# Altium PCB PCB1.PcbDoc (part 2 of 3)
Units mil, origin at the board's own origin, x right, y up, seen from the top; angles counter-clockwise.
Board outline 4825 x 2725 mil, 2 copper layers (Top Layer, Bottom Layer); 148 components, 112 nets, 484 pads, 116 vias.
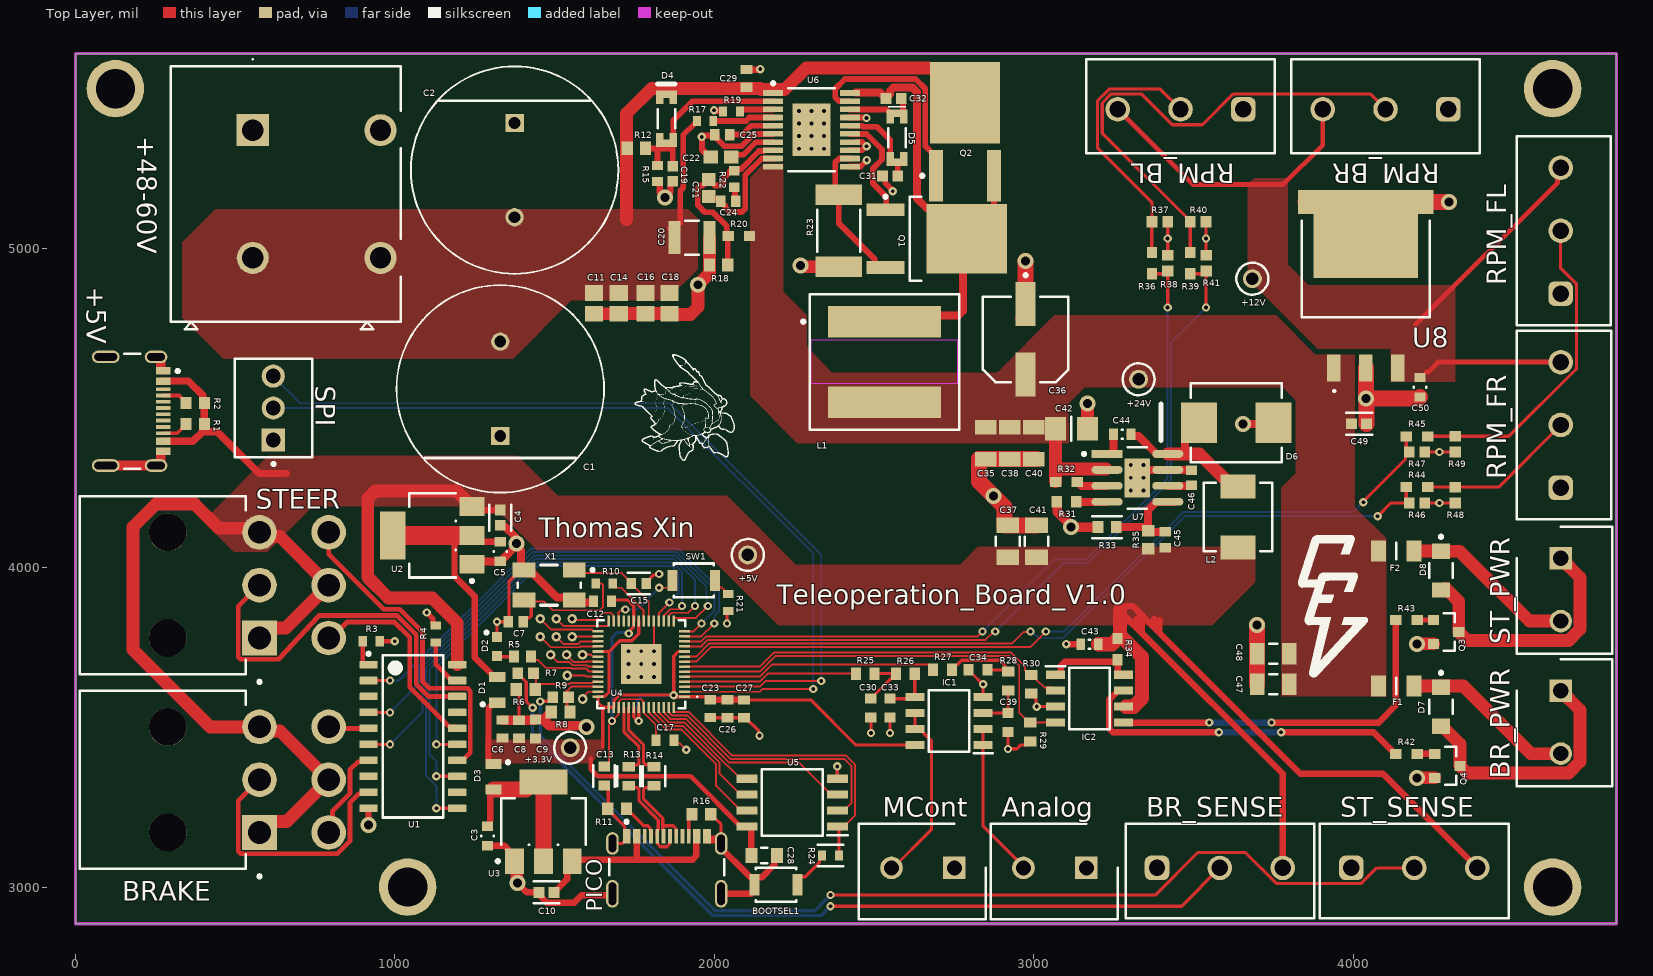
[diagram p0: Top Layer view]

## Part data (continued)
D6: library part CMP-2000-05098-2, "Schottky Barrier Rectifier, 5 A, 60 V, -55 to 125 degC, 2-Pin SMD, RoHS, Tape and Reel", If - Forward Current=5A, Ifsm - Forward Surge Current=100A, Ir - Reverse Current=500uA, Manufacturer="Diodes Incorporated", Manufacturer Part Number=B560C-13-F, Maximum Operating Temperature=+125C, Minimum Operating Temperature=-55C, Operating Temperature Range=-55Cto+125C, Package / Case=SMC, Vf - Forward Voltage=0.7V, Vrrm - Repetitive Reverse Voltage=60V, Brand=DiodesIncorporated, Configuration=Single, Datasheet URL=https://datasheet.ciiva.com/27052/1538961-27052355.pdf, Datasheet Version="Rev. 7-2, 06/2007", Factory Pack Quantity=3000, Height=2.5mm, Length=7.11mm, Manufacturer URL=http://www.diodes.com/, Mounting Style=SMD/SMT, Packaging=Reel, Product=SchottkyDiodes, Product Category=SchottkyDiodes&Rectifiers, RoHS=True, Series=B560, Technology=Si, Termination Style=SMD/SMT, Type=SchottkyBarrierRectifier, Unit Weight=0.007408oz, Width=6.22mm
D7 D8: library part CMP-00278-103808874-1, "NRVBSS34FA Schottky Barrier Rectifier Diode 40V 3A 2-Pin SOD−123FL T/R", Capacitance=152pF, Forward Current=3A, Manufacturer Lifecycle Status=ACTIVE, Max Forward Surge Current (Ifsm)=80A, Max Junction Temperature (Tj)=125°C, Max Repetitive Reverse Voltage (Vrrm)=40V, Min Operating Temperature=-55°C, Peak Reverse Current=500µA, Height=1.43mm, Lifecycle Status=Production, Max Operating Temperature=125°C, NexarPartId=103808874, Reverse Voltage=40V, RoHS=Compliant
F1 F2: "Fuse", Manufacturer_Name=LITTELFUSE, Mouser Part Number=576-046802.5NR, Arrow Part Number=046802.5NR, Arrow Price/Stock=https://www.arrow.com/en/products/046802.5nr/littelfuse?region=nac, Datasheet Link=https://www.littelfuse.com/assetdocs/fuse-468-datasheet?assetguid=6b7857dc-f79c-4aae-8bcc-a9ef11ddef09, Height=0.762mm, Manufacturer_Part_Number=046802.5NR, Mouser Price/Stock=https://www.mouser.co.uk/ProductDetail/Littelfuse/046802.5NR?qs=lHGCbWr7UNKmLbgT05TGjg%3D%3D
IC1: "Integrated Circuit", Manufacturer_Name="Texas Instruments", Mouser Part Number=595-TLV9002IDR, Arrow Part Number=TLV9002IDR, Arrow Price/Stock=https://www.arrow.com/en/products/tlv9002idr/texas-instruments?utm_currency=USD&region=europe, Datasheet Link=http://www.ti.com/lit/gpn/tlv9002, Height=1.75mm, Manufacturer_Part_Number=TLV9002IDR, Mouser Price/Stock=https://www.mouser.co.uk/ProductDetail/Texas-Instruments/TLV9002IDR?qs=xhbEVWpZdWdPu%252BhBN%252BBREg%3D%3D
IC2: "Integrated Circuit", Manufacturer_Name="Texas Instruments", Mouser Part Number=595-UCC27624DR, Arrow Part Number=UCC27624DR, Arrow Price/Stock=https://www.arrow.com/en/products/ucc27624dr/texas-instruments?utm_currency=USD&region=nac, Datasheet Link=https://www.ti.com/lit/ds/symlink/ucc27624.pdf?ts=1654150888910&ref_url=https%253A%252F%252Fwww.ti.com%252Fproduct%252FUCC27624, Height=1.75mm, Manufacturer_Part_Number=UCC27624DR, Mouser Price/Stock=https://www.mouser.co.uk/ProductDetail/Texas-Instruments/UCC27624DR?qs=Rp5uXu7WBW%2FHvRoPIZ55DQ%3D%3D
L1: library part CMP-03913-127637946-2, "Inductor, Aec-Q200, 15Uh, Shielded, 8.3A Rohs Compliant: Yes", Ambient Temperature Range High=85°C, Ambient Temperature Range Low=-40°C, DC Resistance (DCR)=14.8mΩ, Inductance=15µH, Max Operating Temperature=125°C, Saturation Current=7.2A, Height=9.1mm, Length=11.6mm, Min Operating Temperature=-40°C, RoHS=Compliant, Width=10.5mm
L2: library part CMP-02424-000570-1, "Fixed Inductors Commercial Low DCR Series 4.7uH 4.5A 60mΩ 20%", Case/Package=2020, Current Rating=4.5A, DC Resistance (DCR)=60mR, Inductance=4.7uH, Inductance Tolerance=20%, Manufacturer="Vishay Dale", Manufacturer Part Number=IHLP2020CZER4R7M11, Max DC Current=5.2A, Max Operating Temperature=125°C, Min Operating Temperature=-55°C, Package Quantity=2000, Resistance=54mR, RMS Current (Irms)=3.5A, Self Resonant Frequency=27MHz, Test Frequency=100kHz, Core Material=Metal, Depth=5.43mm, Height=3mm, Height - Seated (Max)=0.118inch, Lead Free="Lead Free", Length=5.49mm, Military Standard=Not, Mount="Surface Mount", Number of Pins=2020, Packaging="Tape and Reel", Radiation Hardening=No, Saturation Current=5.2A, Shielding=Shielded, Termination=SMD/SMT, Tolerance=20%, Width=5.18mm
Q1: library part CMP-013-00037-2, "DMT10H009LK3 series N-Channel Mosfet 100V 90A TO252 (DPAK)", Continuous Drain Current (ID)=90A, Drain to Source Resistance=9mΩ, Max Operating Temperature=150°C, Max Power Dissipation=3W, Min Breakdown Voltage=100V, Min Operating Temperature=-55°C, China RoHS=Non-Compliant, Lifecycle Status=Production, Military Standard=MIL-STD-202, Number of Elements=1, Number of Terminals=2, REACH SVHC=No, RoHS=Compliant
Q2: library part CMP-013-00035-2, "Transistor MOSFET N-CH 100V 10A 3-Pin TO-252 Emboss T/R", Continuous Drain Current (ID)=10A, Drain to Source Resistance=147mΩ, Min Breakdown Voltage=100V, Lifecycle Status=Production, Mounting Technology="Surface Mount", Number of Elements=1, Number of Terminals=2, REACH SVHC=No, RoHS=Compliant
Q3 Q4: library part CMP-12801-000047-1, "MOSFET N-CH 60V 1.6A SOT23", Continuous Drain Current=1.6A, Drain To Source Breakdown Voltage=60V, Drain to Source Resistance=92mΩ, Gate To Source Voltage=20V, Input Capacitace At Vds="315pF @ 40V", Manufacturer="Diodes Inc.", Max Forward Diode Voltage=1V, Max Junction Temp=+150°C, Package=SOT23, Power Dissipation=0.7W, Pulse Drain Current=10A, Temperature="-55°C to +150°C", Temperature Range Low=-55°C, Typ Forward Diode Voltage=0.75V, Automotive=No, Category=Trans, ComponentLink2Description=Datasheet, ComponentLink2URL=https://www.diodes.com/assets/Datasheets/DMN6140L.pdf, Depletion Mode=False, Device Class L1="Discrete Semiconductors", Device Class L2=Transistors, Device Class L3=MOSFETs, Digikey Description="MOSFET N-CH 60V 1.6A SOT23", Drain To Source Voltage=60V, Footprint Url=https://www.diodes.com/assets/Package-Files/SOT23.pdf, Gate Charge At Vgs="8.6nC @ 10V", Height=1.1mm, Lead Free=Yes, Manufacturer Part Number=DMN6140L-13, Mouser Description="MOSFET 31V to 99V N-Ch FET 60Vds 20Vgs 2.3A", Number Of Channels=1, Number Of N Channels=1, Octopart=https://octopart.com/dmn6140l-13-diodes+inc.-38898616, Reverse Recovery Charge=9nC, Reverse Recovery Time=16.8ns, RoHS=TRUE, Rthja Max=183°C/W, Standoff Height=0.013mm, Temperature Range High=+150°C, Threshold Vgs Max=3V, Threshold Vgs Min=1V, Turn Off Delay Time=16.3ns, Turn On Delay Time=2.6ns
R1 R2 R33: library part CMP-02407-001424-1, "RES SMD 100 OHM 1% 1/8W 0603", Case Code (Imperial)=0603, Case Code (Metric)=1608, Manufacturer=YAGEO, Manufacturer Part Number=RC0603FR-0710KL, Max Operating Temperature=125°C, Max Power Dissipation=100mW, Min Operating Temperature=-55°C, Resistance=10kR, Temperature Coefficient=25ppm/°C, Tolerance=0.1%, Case/Package=0603, Composition="Thin Film", Features="Automotive AEC-Q200", Number of Terminations=2, Packaging="Tape and Reel"
R3 R4: library part CMP-03412-040480-1, "Anti-Sulfurated Chip Resistors Automotive Grade 0Ω   0603", Case/Package=0603, Manufacturer=YAGEO, Max Operating Temperature=155°C, Max Power Dissipation=100mW, Min Operating Temperature=-55°C, Resistance=0R, Resistor Type="Thick Film", Tolerance=5%, Features="Moisture Resistant", Height=0.022inch, Length=0.063inch, Manufacturer Part Number=AA0603JR-070RL, Number of Terminations=2, Packaging="Tape and Reel", RoHS Compliant=Yes, Series=AF, Width=0.031inch
R5: library part CMP-2000-00205-1, Manufacturer=Panasonic, Part Number=ERJ-3EKF1150V
R6 R8: "Resistor", Manufacturer_Name=Vishay, Arrow Part Number=MCT06030D5001BP500, Arrow Price/Stock=https://www.arrow.com/en/products/mct06030d5001bp500/vishay?utm_currency=USD&region=nac, Datasheet Link=http://www.vishay.com/docs/28705/mcx0x0xpro.pdf, Height=0.55mm, Manufacturer_Part_Number=MCT06030D5001BP500
R7 R9 R38 R41 R46 R47: library part CMP-2000-00945-2, "RES SMD 2K OHM 0.1% 1/10W 0603", Case Code (Imperial)=0603, Case Code (Metric)=1608, Max Operating Temperature=155°C, Max Power Dissipation=100mW, Min Operating Temperature=-55°C, Package Quantity=5000, Resistance=2kR, Resistance Tolerance=0.1%, Resistor Type="Thin Film", Temperature Coefficient=25ppm/°C, Voltage Rating=75V, Case/Package=0603, Construction=Rectangular, Contact Plating=Tin, Depth=0.8mm, Height=0.45mm, Lead Free="Lead Free", Length=1.6mm, Military Standard=Not, Mount="Surface Mount", Number of Pins=2, Number of Terminations=2, Packaging="Tape and Reel", Power Rating=100mW, Radiation Hardening=No, REACH SVHC="No SVHC", RoHS Compliant=Yes, Series=ERA-3A, Technology="THIN FILM", Termination=SMD/SMT, Tolerance=0.1%, Voltage Rating (DC)=75V, Width=0.8mm, Working Voltage=75V
R10 R21 R24: library part CMP-1659-00009-5, "RES 1K OHM 1% 1/10W 0603", Case Code (Imperial)=0603, Case Code (Metric)=1608, Max Operating Temperature=155°C, Max Power Dissipation=100mW, Min Operating Temperature=-55°C, Resistance=1kR, Resistance Tolerance=1%, Resistor Type="Thick Film", Temperature Coefficient=100ppm/°C, Voltage Rating=50V, Case/Package=0603, Construction=Rectangular, Contact Plating=Tin, Depth=0.8mm, Features="Moisture Resistant", Height=0.45mm, Lead Free="Lead Free", Length=1.6mm, Military Standard=Not, Number of Terminations=2, Packaging="Tape and Reel", Power Rating=100mW, Radiation Hardening=No, REACH SVHC="No SVHC", RoHS Compliant=Yes, Series=RC, Size Code=0603, Technology="THICK FILM", Termination=SMD/SMT, Tolerance=1%
R11 R16: library part CMP-009-00178-1, "Fixed Resistor, Metal Glaze/thick Film, 0.1W, 5100ohm, 75V, 1% +/-Tol, 100ppm/Cel, Surface Mount, 0603", Case/Package=0603, Max Operating Temperature=155°C, Min Operating Temperature=-55°C, Power=100mW, Tolerance=1%, Mounting Technology="Surface Mount", Pins=2, RoHS Compliant=Yes
R12: library part CMP-2000-00591-1, Manufacturer=Panasonic, Part Number=ERJ-3EKF6192V
R13 R14: library part CMP-2000-03146-2, "RES Thick Film, 27.4Ω, 1%, 0.1W, 100ppm/°C, 0603", Case Code (Imperial)=0603, Case Code (Metric)=1608, Max Operating Temperature=155°C, Max Power Dissipation=100mW, Min Operating Temperature=-55°C, Package Quantity=10, Resistance=27.4R, Temperature Coefficient=100ppm/°C, Tolerance=1%, Voltage Rating=75V, Case/Package=0603, Composition="Thick Film", Contact Plating=Tin, Depth=0.85mm, Features="Automotive AEC-Q200", Height=0.45mm, Lead Free="Lead Free", Length=1.55mm, Military Standard=Not, Mount="Surface Mount", Number of Pins=2, Number of Terminations=2, Packaging="Tape and Reel", Power Rating=100mW, Radiation Hardening=No, Termination=SMD/SMT, Voltage Rating (DC)=75V, Weight=7.1E-05oz, Width=0.85mm
R15: library part CMP-2000-00479-1, Manufacturer=Panasonic, Part Number=ERJ-3EKF3921V
R17: library part CMP-1659-00056-1, "Chip Resistor, 1 MOhm, +/- 1%, 100 mW, -55 to 155 degC, 0603 (1608 Metric), RoHS, Tape and Reel", Capacitance="1 mF", Case\Package=Radial, Max Operating Temperature="85 degC", Min Operating Temperature="-40 degC", Package Quantity=200, Tolerance=20%, Voltage Rating="25 V", ComponentLink1Description="Manufacturer URL", ComponentLink1URL=http://www.yageo.com/, ComponentLink2Description=Datasheet, ComponentLink2URL=http://www.yageo.com/documents/recent/PYu-RC_Group_51_RoHS_L_04.pdf, DatasheetVersion="Rev. 4, 02/2016", Diameter="10 mm", Height="20 mm", Lead Pitch="5 mm", Length="20 mm", Mount="Through Hole", PackageDescription="2-Pin Surface Mount Device, Body 1.6 x 0.8 mm", PackageReference=0603, Packaging=Bulk, Radiation Hardening=No, REACH SVHC="No SVHC", RoHSCompliant=true, Voltage Rating (DC)="25 V", Width="0 inch"
R18: library part CMP-2000-00250-1, Manufacturer=Panasonic, Part Number=ERJ-3EKF1431V
R19: library part CMP-009-00181-1, "100mW Thick Film Resistors 75V ±100ppm/℃ ±1% 12.4kΩ 0603 Chip Resistor - Surface Mount ROHS", Case Code (Imperial)=0603, Max Operating Temperature=155°C, Max Power Dissipation=100mW, Min Operating Temperature=-55°C, Temperature Coefficient=100ppm/°C, Tolerance=1%, Voltage Rating=75V, Voltage Rating (DC)=50V, Case/Package=0603, China RoHS=Non-Compliant, Composition="Thick Film", Depth=800µm, Features="Moisture Resistant", Height=450µm, Lead Free="Lead Free", Length=1.6002mm, Lifecycle Status=Production, Military Standard=Not, Mounting Technology="Surface Mount", Number of Terminals=2, Number of Terminations=2, Packaging="Tape & Reel", Power Dissipation=100mW, Power Rating=100mW, REACH SVHC=Yes, RoHS=Compliant, Schedule B="8533210045, 8533210045", Termination=SMD/SMT, Width=800µm, Working Voltage=75V
R20: library part CMP-03412-031734-1, "RES SMD 26.7K OHM 0.1% 1/10W", Manufacturer=Yageo, Package=RT0603, Power Rating=0.1W, Resistance=26.7KΩ, Temperature="-55°C to +155°C", Temperature Coefficient="50 ppm/°C", Temperature Range High=+155°C, Temperature Range Low=-55°C, Tolerance=0.001, Voltage Rating=75V, Automotive=No, Category=Res, ComponentLink2Description=Datasheet, ComponentLink2URL=http://www.yageo.com/documents/recent/PYu-RT_1-to-0.01_RoHS_L_9.pdf, Composition="Thin Film", Device Class L1="Passive Components", Device Class L2=Resistors, Device Class L3="Chip SMD Resistors", Digikey Description="RES SMD 26.7K OHM 0.1% 1/10W", Footprint Url=http://www.yageo.com/exep/pages/download/literatures/PYu-R_Mount_10.pdf, Height=0.55mm, Ipc Land Pattern Name=RESC16080X45, Lead Free=Yes, Manufacturer Part Number=RT0603BRE0726K7L, Octopart=https://octopart.com/rt0603bre0726k7l-yageo-1474480, RoHS=TRUE, Series=RT
R22: library part CMP-1012-00650-3, "Fixed Resistor, Metal Glaze/thick Film, 0.1W, 18000ohm, 75V, 1% +/-Tol, 100ppm/Cel, Surface Mount, 0603", Manufacturer=Panasonic, Part Number=ERJ3EKF1802V
R23: library part CMP-03412-022467-1, "METAL CURRENT SENSOR 2512 1% 50P", Manufacturer=Yageo, Package=PA2512E-R007-0R10, Power Rating=2W, Resistance=7mΩ, Temperature="-55°C to +170°C", Temperature Coefficient=50ppm/°C, Temperature Range High=+170°C, Temperature Range Low=-55°C, Tolerance=1%, Automotive=Yes, Automotive Grade="Grade 0", Category=Res, ComponentLink2Description=Datasheet, ComponentLink2URL=http://www.yageo.com/documents/recent/PYu-PA_E_51_RoHS_10.pdf, Composition="Metal Element", Device Class L1="Passive Components", Device Class L2=Resistors, Device Class L3="Chip SMD Resistors", Digikey Description="METAL CURRENT SENSOR 2512 1% 50P", Height=0.88mm, Ipc Land Pattern Name=RESC635318X63, Lead Free=Yes, Manufacturer Part Number=PA2512FKE7W0R007E, Octopart=https://octopart.com/pa2512fke7w0r007e-yageo-96322223, RoHS=TRUE, Series=PA_E
R25 R26 R27 R28 R29 R30: library part CMP-009-00017-5, "Chip Resistor, 10 KOhm, +/- 1%, 01 W, -55 to 155 degC, 0603 (1608 Metric)", Case/Package=0603, Manufacturer=YAGEO, Manufacturer Part Number=RC0603FR-0710KL, Max Operating Temperature=155°C, Min Operating Temperature=-55°C, Power=100mW, Tolerance=1%, Voltage Rating=50V, Mounting Technology=SM, Pins=2, RoHS Compliant=True
R31: library part CMP-03412-016864-2, "RES 26.7KΩ 1.00% 0.1W 0603", Case Code (Imperial)=0603, Case Code (Metric)=1608, Manufacturer="Vishay Dale", Manufacturer Part Number=CRCW060326K7FKEA, Max Operating Temperature=155°C, Max Power Dissipation=100mW, Min Operating Temperature=-55°C, Resistance=26.7kR, Resistor Type="Thick Film", Temperature Coefficient=100ppm/°C, Tolerance=1%, Voltage Rating=50V, Case/Package=0603, Features="Moisture Resistant", Height=0.022inch, Length=0.063inch, Number of Terminations=2, Packaging="Tape and Reel", Power Rating=100mW, RoHS Compliant=Yes, Series=AC, Termination=SMD/SMT, Weight=7.1E-05oz, Width=0.8mm
R32: library part CMP-03412-022575-2, "RES 100KΩ 1.00% 0.1W 0603", Case/Package=0603, Manufacturer=YAGEO, Manufacturer Part Number=RC0603FR-07100KL, Resistance=100kR, Tolerance=1%, RoHS Compliant=Yes